# Altium PCB DFMM_2025_V2.4.PcbDoc (part 2 of 2)
Units mil, origin at the board's own origin, x right, y up, seen from the top; angles counter-clockwise.
Board outline 3287.4 x 3929 mil, 4 copper layers (Top Layer, GND Plane Top, GND Plane Bott, PWR Plane), stack 33.512 mil thick; 148 components, 96 nets, 516 pads, 245 vias.
Unrouted connection lines stored in the file: 38.
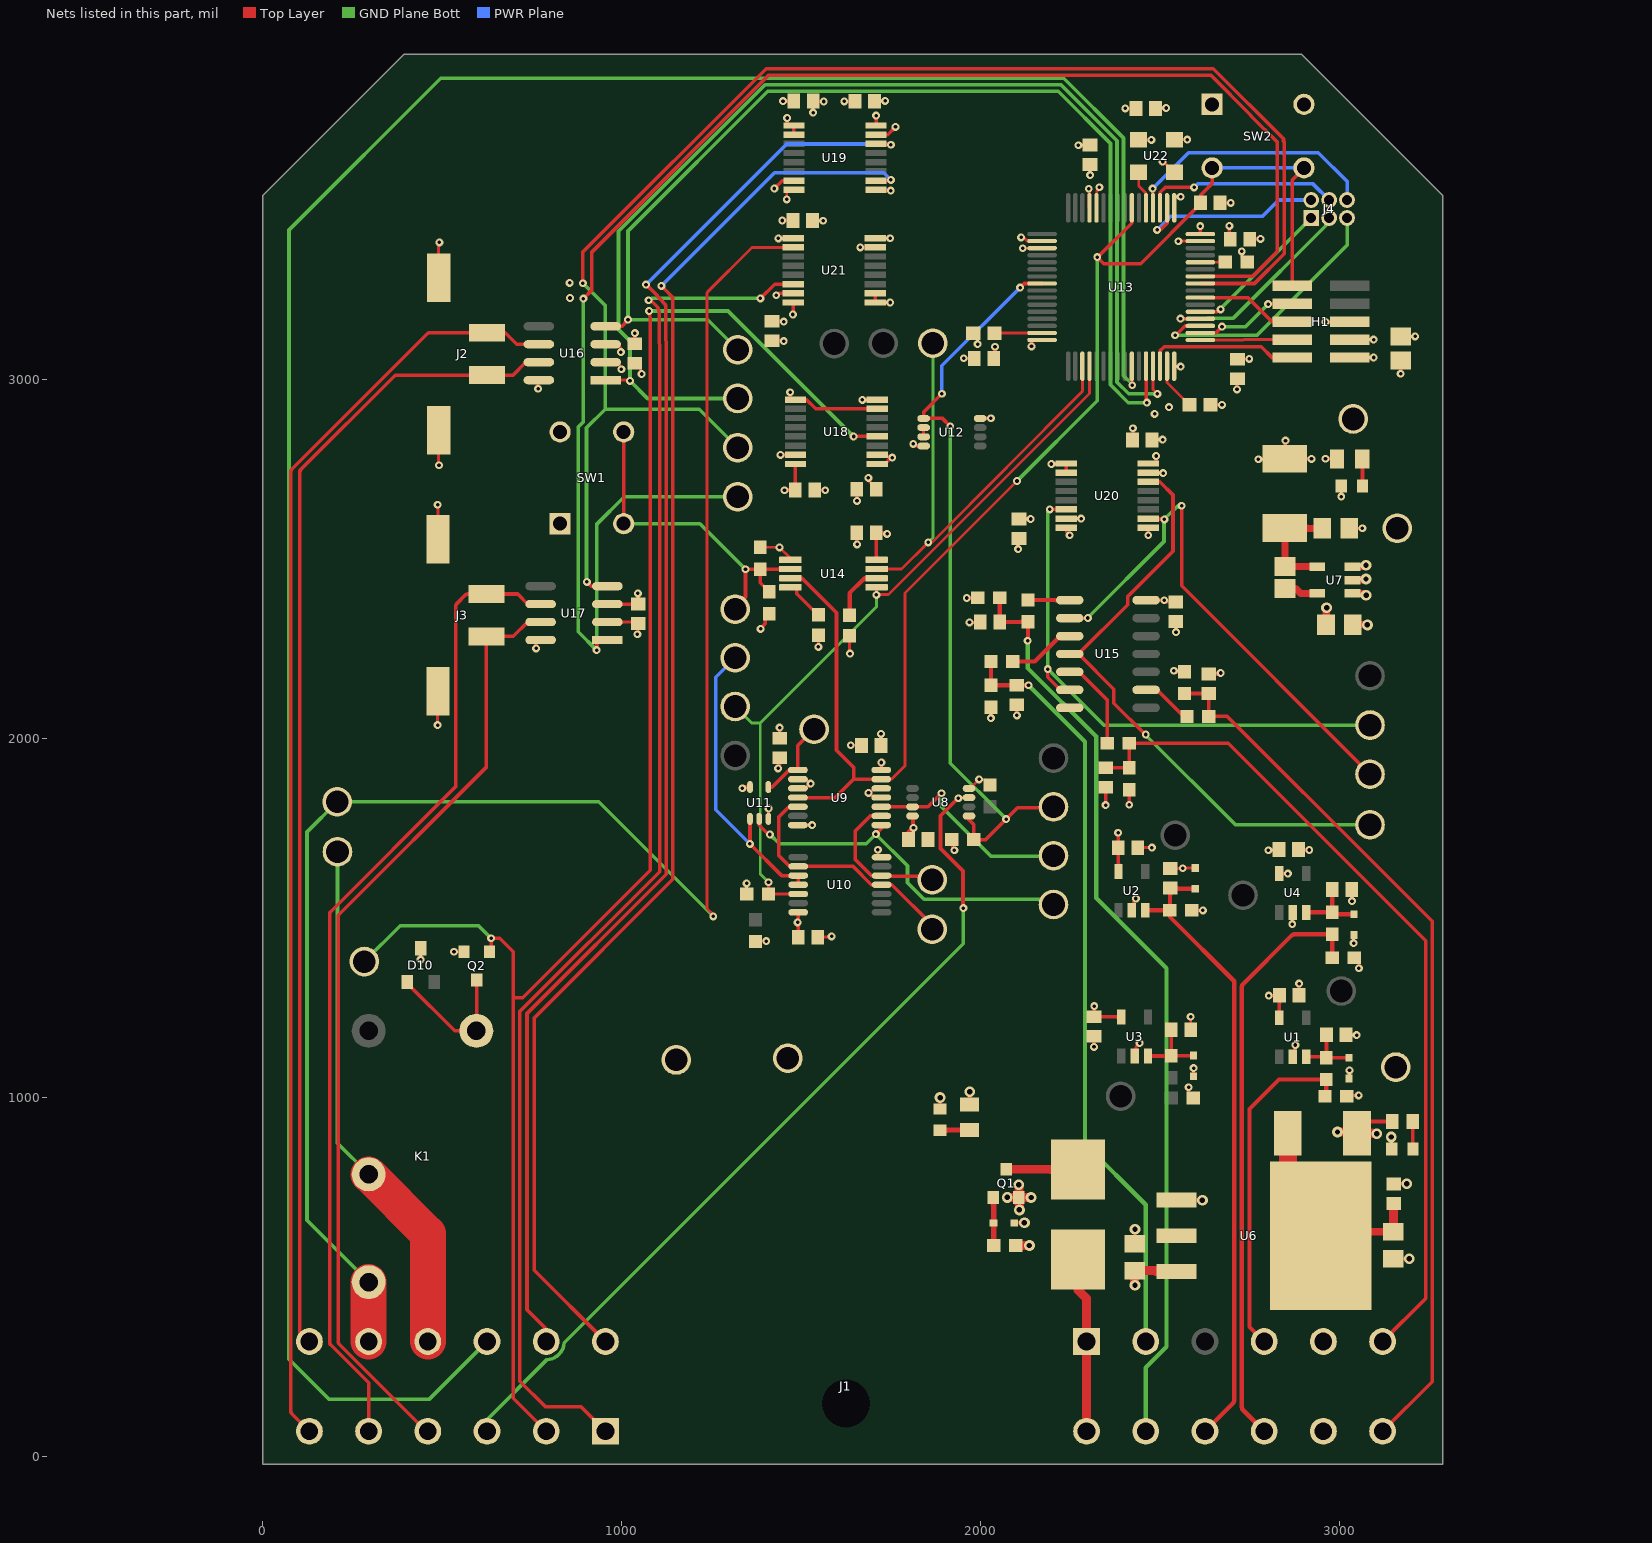
[diagram p4: the nets of this part, all layers, seen from the top]

## Via types
v1: diameter 22, hole 10, Top Layer to PWR Plane, tented both sides, 224 vias
v2: diameter 30, hole 15, Top Layer to PWR Plane, tented both sides, 21 vias

## Nets (pads, with @x,y where several pads share a name; then routed paths per layer and width w, separated by ;. In a path a pad name is that pad's centre, name@x,y a point inside that pad or via, vN(x,y) a via of type N, cw(c..) or ccw(c..) an arc to the next point about the centre after c; other vN are vias at no path point) (continued)
12V_ROT_2_SIG: ROTR2.1 U15.6 U20.6 | length 1557.8
  Top Layer w10: v1(2187,2193) 2187,2169.83 2221.83,2135 U15.6@2248.4,2135 ; v1(2192.51,2638) 2192.7,2637.82 U20.6@2238.65,2637.82
  GND Plane Bott w10: ROTR2.1@3085,2037 2343,2037 v1(2187,2193) 2187,2629.78 v1@2192.51,2635.29 ; v1@2192.51,2635.29 v1(2192.51,2638) v1@2192.51,2635.29
12V_ROT_3_SIG: ROTR3.1 U15.2 U20.10 | length 1490.5
  Top Layer w10: U15.2@2248.4,2335 2298.62,2335 v1(2298.79,2335.17) ; U20.10@2467,2612.23 U20.10@2491.53,2611 ; U20.10@2491.53,2608.54 U20.10@2491.53,2611 ; v1(2512,2610) 2510.89,2611.11 2491.53,2611.11 U20.10@2491.53,2611 ; v1(2560,2648) 2560,2425 ROTR3.1@3085,1900
  GND Plane Bott w10: v1(2298.79,2335.17) 2298.79,2336 2511,2548.21 v1@2511,2610 ; v1(2512,2610) 2548,2646 2558,2646 v1(2560,2648)
12V_ROT_4_SIG: ROTR4.1 U15.4 U20.14 | length 1695
  Top Layer w10: U15.4@2248.4,2235 2272,2235 2409.61,2372.61 2409.61,2395.28 2536,2521.66 2536,2678 2499.41,2714.59 U20.14@2467,2714.59 U20.14@2468.3,2713.3 ; U15.4@2273,2235 2371.06,2136.94 2371.06,2097.94 2458.31,2010.69 v1(2460.15,2010.69)
  GND Plane Bott w10: v1(2460.15,2010.69) 2460.15,2008.85 2710,1759 ROTR4.1@3085,1759
+3V3: +3v3.1 C17.1 C18.1 C19.1 C20.1 C21.1 C22.2 C23.2 C24.2 C25.2 C28.1 C34.1 C38.1 C39.1 C43.1 C44.1 C46.1 C47.2 F4.2 H1.1 R12.2 R23.2 U8.8 U9.14 U10.14 U11.5 U12.8 U13.1 U13.13 U13.19 U13.32 U13.48 U13.64 U14.8 U16.3 U17.3 U18.1 U18.2 U18.7 U18.9 U18.15 U19.16 U20.16 U21.16 U22.1 U22.4 | length 2132.5
  Top Layer w8: U17.3@995.95,2374 U17.3@996.79,2373.17 ; v1(2117.41,3365.43) 2117.59,3365.61 2171.07,3365.61 U13.19@2171.26,3365.8 ; C47.2@2504.17,3756 2516.61,3756 v1(2516.88,3756.27) ; v1(2507.22,3607.13) 2508.63,3607.13 2538.03,3577.72 U22.4@2540,3577.72 ; U13.48@2539.37,3037.06 2540.86,3035.56 v1(2557.28,3035.56) ; U22.1@2540,3668.28 2575.34,3668.28 v1(2575.62,3667.99) ; C25.2@2716,3056.33 2747.68,3056.33 v1(2748.47,3057.13)
  Top Layer w10: U16.3@955.06,3098 986.3,3098 996.08,3088.22 996.08,3077.9 v1(997.77,3076.22) ; U17.3@960.06,2374 995.95,2374 1024.36,2374 1024.53,2374.17 C38.1@1046,2374.17 1046,2402.88 v1(1045,2403.88) ; C34.1@1036,3099.17 1036,3128.13 v1(1036.75,3128.88) ; v1(1336,1861) 1338.71,1861 1342,1864.29 U11.5@1357.41,1864.29 ; v1(1387,2305) 1387,2307 1400.43,2320.43 1400.43,2333.79 1401.2,2334.56 R23.2@1414.56,2334.56 ; C44.1@1419,3162.17 1450.24,3162.17 v1(1451.47,3160.93) ; C18.1@1434.41,1943 1439.66,1937.75 1439.66,1926.59 1438.13,1925.07 1438.13,1918.41 v1(1435.83,1916.12) ; v1(1442.3,2789.77) 1453.04,2789.77 1453.3,2790.02 U18.15@1483.83,2790.02 ; v1(1469.07,2964.43) 1469.07,2947.37 1472.87,2943.57 1515.01,2943.57 1540.6,2917.98 U18.7@1712.17,2917.98 ; v1(1477,3181) 1477.83,3181.83 U21.16@1477.83,3214.43 U21.16@1478,3210.57 ; C19.1@1491.83,1446 1491.83,1485.17 v1(1490,1487) 1491.86,1488.86 U10.14@1491.86,1515.23 ; v1(1687.14,2725.61) 1689.43,2723.31 1689.43,2716.65 1709.33,2696.76 C46.1@1709.33,2694 ; C43.1@1704.17,3775 1732.94,3775 v1(1733.88,3775.95) ; U19.16@1708.17,3707.57 1709,3708.39 v1(1709,3735) ; U18.1@1709.33,2761.59 U18.1@1712.17,2764.43 ; U14.8@1710.08,2497.39 1710.08,2507.24 1709.17,2508.16 C28.1@1709.17,2573 1710.17,2572 1737.09,2572 v1(1739.37,2569.72) ; U18.2@1712.17,2790.02 1713.91,2788.29 1738.82,2788.29 v1@1745.1,2782.02 ; U18.1@1716.03,2768.29 1736.7,2768.29 1745.1,2776.69 v1@1745.1,2782.02 ; C20.1@1722.33,1980 1722.33,2012.38 v1(1722.42,2012.47) ; U9.14@1723.14,1911.77 1723.14,1932.45 v1(1723.32,1932.63) ; v1(1753.7,2782.02) v1@1745.1,2782.02 ; C17.1@1798.83,1718 1798.83,1739.07 1810.24,1750.47 v1(1812.99,1750.47) ; U8.8@1810.26,1783.61 1811.63,1782.25 1811.63,1749.04 v1@1812.99,1747.67 ; U12.8@1998.74,2891.39 1999.03,2891.67 2028.16,2891.67 v1(2028.45,2891.96) ; C23.2@2036.98,3058.5 2040,3061.52 v1(2040,3090.97) ; v1(2141.71,3091.98) 2141.71,3109.05 2142.54,3109.89 U13.32@2171.26,3109.89 ; v1(2301.29,3531.24) 2302.8,3529.73 2302.8,3478.35 U13.13@2303.15,3478 ; C22.2@2305,3599.17 2305.11,3599.06 v1(2305.11,3569.45) ; U20.16@2467,2765.77 2485.17,2765.77 2489.03,2769.63 v1(2489.03,2786.63) ; C39.1@2477.33,2831.41 2478.09,2832.17 v1(2507.05,2832.17) ; U13.1@2539.37,3442.57 U13.1@2539.37,3492.84 ; U13.1@2539.37,3489.84 2539.37,3507.88 2540.21,3508.72 2556.99,3508.72 v1(2557.28,3509) ; v1(2612,3427) 2612,3405.37 U13.64@2612.2,3405.17 ; v1(2693,3428) 2693,3393.83 C24.2@2695.83,3391 ; v1(2773.99,2777.63) 2846.72,2777.63 F4.2@2848,2778.91 ; v1(2849.43,2829.5) 2848,2828.07 F4.2@2848,2778.91 ; v1(2922.01,2778.7) 2921.8,2778.91 F4.2@2848,2778.91 ; v1(2960.88,2779.06) 2991.51,2779.06 R12.2@2992.57,2778 ; H1.1@3028,3061 v1(3095,3061.01) ; C21.1@3170,3052.54 3170.26,3052.27 v1(3170.26,3015.93)
+5V: +5V.1 C15.1 F2.2 R13.1 U7.1 U7.3 | length 343.1
  Top Layer w10: F2.2@3048.91,900 3081.39,932.47 R13.1@3147,932.47
  Top Layer w20: U7.1@3036.21,2403.6 3066.7,2403.6 3071.29,2399 v2(3074,2399) ; U7.3@3036.21,2478.4 3067.4,2478.4 3069.09,2480.09 3071.95,2480.09 v2(3073.87,2482) ; C15.1@3037,2317 3076.61,2317 v2(3077.61,2316)
  Top Layer w25: v2(2994.33,903) 3045.91,903 F2.2@3048.91,900 3090.74,900 3091.78,898.96 3103.04,898.96 v2(3104,898)
+12V: +12V.1 C5.2 C6.2 C7.2 C8.2 C12.1 C37.2 C40.1 C41.2 C42.2 C45.2 D9.1 D10.3 Q1.2 R11.2 R26.1 R27.1 R30.1 R31.1 U1.5 U2.5 U3.5 U4.5 U6.3 U15.14 U18.16 U19.1 U19.2 U19.7 U19.9 U19.15 U20.1 U20.2 U20.7 U20.9 U20.15 U21.1 U21.2 U21.7 U21.9 U21.15 | length 1772.6
  Top Layer w10: v1(439.9,1383.56) 439.9,1415.15 D10.3@440,1415.24 ; v1(1425.27,3532.01) 1447.28,3554.02 U19.7@1479.83,3554.02 ; v1(1430.56,3234.6) 1433.27,3234.6 1438.7,3240.02 U21.15@1477.83,3240.02 ; v1(1436.3,3393) 1436.58,3393.28 1477.54,3393.28 U21.9@1477.83,3393.57 ; v1(1447.28,3442.88) 1447.4,3443 C42.2@1477,3443 ; v1(1449.28,3775.54) 1478.54,3775.54 C41.2@1479,3776 ; v1(1453.45,2691.26) 1454.19,2692 C45.2@1483.17,2692 1483.83,2692.66 U18.16@1483.83,2764.43 ; v1(1461.01,3728.43) 1461.01,3711.43 1464.87,3707.57 U19.1@1479.83,3707.57 U19.2@1479.83,3681.98 ; v1(1664.65,3367.89) 1664.69,3367.93 1706.13,3367.93 U21.7@1706.17,3367.98 ; U21.2@1706.17,3240.02 U21.1@1706.17,3214.43 1706.26,3214.34 1747.61,3214.34 v1(1747.7,3214.25) ; U19.9@1708.17,3528.43 1709.4,3527.2 1748.47,3527.2 v1(1749.7,3525.98) ; U19.15@1708.17,3681.98 1741.19,3681.98 v1(1762.73,3703.52) ; v1(1961.28,2390.89) 1990.87,2390.89 R27.1@1991.98,2392 ; R11.2@1969,979.43 1970,980.43 v2(1970,1015.12) ; v1(2028.45,2056.28) 2028.45,2086.43 R26.1@2029,2086.98 ; D9.1@2093.94,650 v2(2122,650) ; C40.1@2107.03,2611.13 2107.17,2611 2129.66,2611 2129.75,2611.1 v1(2139.47,2611.1) ; v1(2197.13,2764.41) 2197.81,2765.09 2237.97,2765.09 U20.1@2238.65,2765.77 U20.2@2238.65,2740.18 ; U20.7@2238.65,2612.23 2238.75,2612.13 2280.08,2612.13 v1(2280.18,2612.03) ; v1(2316.53,1253.88) 2316.53,1224.7 C7.2@2316,1224.17 2377.88,1224.17 2378.79,1223.26 U3.5@2391.6,1223.26 ; v1(2383,1737) 2383.83,1736.17 C6.2@2383.83,1695 2383.83,1651.3 2384.2,1650.94 U2.5@2384.2,1629.27 ; v1(2414,1815) R30.1@2414,1856.98 ; U15.14@2461,2385 2461.06,2384.94 v1(2511.53,2384.87) v1(2511.53,2384.87) ; v1(2467,2565.78) U20.9@2467,2586.64 ; U20.15@2467,2740.18 2467.58,2739.6 2507.97,2739.6 v1(2508.55,2739.02) ; v1@2512.03,2384.61 2515.04,2384.61 2519.48,2380.17 C37.2@2544,2380.17 ; v1(2538.28,2188.3) 2540.56,2186.02 R31.1@2568,2186.02 ; v1(2801.95,1688.04) 2803.91,1690 C8.2@2831.67,1690 ; v1(2802.95,1283.21) 2831.88,1283.21 C5.2@2832.67,1284 2832.67,1262.53 2832.6,1262.46 U1.5@2832.6,1221.26 ; U4.5@2832.2,1623.27 2845.1,1623.27 v1(2856.01,1623.27)
  Top Layer w25: v2(2074.32,720.98) 2075.67,720.98 2076.64,721.96 2078.18,721.96 2079.51,720.63 Q1.2@2106.43,720.63 ; v2(2106,756) 2106.43,755.57 Q1.2@2106.43,720.63 ; v2(2108,686) 2106.98,715.41 Q1.2@2106.43,720.63 ; v2(2140.63,720.63) Q1.2@2106.43,720.63 ; v2(2430,475.99) 2429.04,476.95 2429.04,486.96 2429,487 C12.1@2429,516.6 2486.2,516.6 2488.8,514 U6.3@2545.91,514
+12V_IN: F3.1 J1.B1 J1.B12 | length 488
  Top Layer w25: F3.1@2271,547.41 2271,462.94 2295.2,438.75 J1.B1@2295.2,319.39 J1.B12@2295.2,69.39
\u\R\S\T\: C29.2 H1.10 SW2.3 SW2.4 U9.4 U9.13 U13.7 U14.3 | length 3880.2
  Top Layer w8: U9.13@1723.14,1886.18 1751.7,1886.18 1789.1,1923.58 1789.1,2404.82 v1(2101.28,2717)
  Top Layer w10: U14.3@1469.92,2446.2 1502.42,2446.2 1598.5,2350.12 1598.5,1966.5 1646,1919 1646,1886.18 ; U9.4@1490.86,1835 1594.82,1835 1646,1886.18 ; U9.13@1723.14,1886.18 1646,1886.18 ; U13.7@2421.26,3478 2421.26,3435.52 2326.74,3341 v1(2325,3341) 2343.33,3322.67 2446.26,3322.67 2612.83,3489.24 2612.83,3513.47 2645.05,3545.68 SW2.3@2645.05,3589.42 ; U13.7@2421.26,3514.27 U13.7@2422.04,3513.49 ; H1.10@2868,3261 2868,3555.46 SW2.4@2900.95,3588.42
  GND Plane Bott w10: v1(2101.28,2717) 2325,2940.72 v1(2325,3341)
  PWR Plane w10: SW2.3@2645.05,3589.42 SW2.4@2900.95,3589.42
\W\D\O\: R18.1 U10.12 U13.36 U14.5 WDO.1 | length 2069.6
  Top Layer w8: R18.1@1409,1566 v1(1409,1599) ; R18.1@1409,1566.41 U10.12@1491.86,1566.41 ; v1(1709.62,2399.76) 1709.62,2420.15 U14.5@1710.08,2420.61 ; v1@1712.53,2400.76 1743.36,2400.76 2303.15,2960.54 U13.36@2303.15,3037.06
  GND Plane Bott w8: WDO.1@1316,2088.67 1362.07,2042.59 1386,2042.59 ; v1(1409,1599) 1386,1622 1386,2042.59 ; v1(1709.62,2399.76) 1710,2399.37 1710,2366.59 1386,2042.59
ANL_1: J1.A11 U19.14 | length 4038
  Top Layer w10: J1.A11@789.69,319.39 786.14,322.93 786.14,357.79 736,407.93 736,1233.46 1123.78,1621.24 1123.78,3012.21 ; v1(1067.76,3264.24) 1092.73,3240.37 1120.44,3209.54 cw(c1113,3202.86) 1123,3202.86 1123.78,3012.26 ; U19.14@1708.17,3656.39 1709.36,3655.2 1748.95,3655.2 v1(1750.13,3654.02)
  PWR Plane w10: v1(1067.76,3264.24) 1459.53,3656 1748.15,3656 v1(1750.13,3654.02)
ANL_2: J1.A12 U19.10 | length 4016.9
  Top Layer w10: J1.A12@954.65,319.39 756,518.03 756,1221 1142,1607 1142,3224.44 1142,3224.49 ccw(c1132,3224.38) 1139.1,3231.43 1134.14,3236.41 1130.89,3239.69 v1(1110.41,3260.56) ; U19.10@1708.17,3554.02 1747.94,3554.01 v1(1749.9,3555.98)
  PWR Plane w10: v1(1110.41,3260.56) 1425.84,3576 1729.88,3576 v1(1749.9,3555.98)
AS_CLOSE_SDC: "SDC CLS.1" R15.1 U8.1 U12.1 U13.24 | length 2113.2
  Top Layer w10: v1(1892,2960) 1841.26,2909.26 U12.1@1841.26,2891.39 1893.7,2891.39 v1(1915.47,2869.61) ; U8.1@1967.74,1783.61 1967.74,1772.97 1981,1759.71 R15.1@1981,1718 ; R15.1@1981.98,1718 2014,1718 v1(2071,1775) 2103,1807 2203,1807 ; v1(2110,3256) 2121.37,3267.37 U13.24@2171.26,3267.37
  GND Plane Bott w10: v1(1915.47,2869.61) 1915.47,1930.53 v1(2071,1775)
  PWR Plane w10: v1(1892,2960) 1892,3038 v1(2110,3256)
AS_SDC_FAULT: "AS SDC FLT.1" J1.A2 Q2.1 U18.4 | length 4768.2
  Top Layer w10: 260,1376 260.5,1375.5 ; Q2.1@631.43,1405.37 636,1418.09 v1(636,1443) 660.51,1443 698,1405.51 698,1277 ; 698,1250.37 698,1251 ; J1.A2@789.69,69.39 698,161.07 698,1251 ; v1(1076.43,3190.75) 1079.47,3168.04 1079.47,1632.47 724,1277 698,1277 ; v1(1646,2841) 1646.2,2841.2 U18.4@1712.17,2841.2 ; 698,1251 698,1277
  GND Plane Bott w10: 283,1378 383,1478 601,1478 v1(636,1443) ; v1(1076.43,3190.75) 1296.25,3190.75 v1(1646,2841)
ASSI_TX: J1.A10 U13.42 | length 7132.2
  Top Layer w10: U13.42@2421.26,3037.06 2421.61,3036.71 2421.61,2984.55 v1(2422.41,2983.75)
  GND Plane Bott w10: J1.A10@624.72,319.39 464.34,159 184,159 73,270 73,3416.54 495.46,3839 2231.46,3839 2398,3672.46 2398,3010.71 2422.41,2986.3 v1(2422.41,2983.75)
BMS_FAULT: J1.B4 R1.1 R2.2 | length 960.5
  Top Layer w12: J1.B4@2790.08,319.39 2749.3,360.17 2749.3,967.3 2831.5,1049.5 2944.22,1049.5 2944.29,1049.43 R1.1@2963.01,1049.43 2963.01,1006.52 R2.2@2959.49,1003
BSPD_FAULT: J1.B9 R6.1 R7.2 | length 1642.8
  Top Layer w12: J1.B9@2790.08,69.39 2731.51,127.95 cw(c2740,136.44) 2728,136.39 2728,1307.03 cw(c2740,1307.03) 2731.51,1315.51 2866.49,1450.49 cw(c2874.95,1441.98) 2874.95,1453.98 R6.1@2980,1453.98 2980,1408.23 2979.49,1407.72 R7.2@2979.49,1389
CAN1_N: J1.A7 J2.1 U16.7 | length 3225.1
  Top Layer w10: J1.A7@129.84,319.39 105.91,343.32 cw(c113,350.37) 103,350.37 103,2741.86 cw(c113,2741.86) 105.93,2748.93 366.02,3009.02 cw(c373.09,3001.95) 373.09,3011.95 J2.1@624.65,3011.95 697,3011.95 733.05,3048 758.65,3048 U16.7@753.06,3042.4
CAN1_P: J1.A6 J2.2 U16.6 | length 3550.4
  Top Layer w10: J1.A6@129.84,69.39 80.93,118.3 cw(c88,125.37) 78,125.37 78,2742.86 cw(c88,2742.86) 80.91,2749.91 458.13,3127.13 cw(c465.21,3120.06) 465.21,3130.06 J2.2@624.65,3130.06 675.65,3130.06 707.71,3098 U16.6@758.65,3098
CAN1_RX: "C1 RX.1" U13.44 U16.4 | length 3111.6
  Top Layer w10: U16.4@965.35,3148 992.76,3148 1001.05,3148 1006.9,3153.86 1016.54,3166.65 v1(1017.54,3166.65) ; U13.44@2460.63,3037.06 2460.98,3036.71 2460.98,2937.44 v1(2463.23,2935.19)
  GND Plane Bott w10: 1323,3083 1239.35,3166.65 v1(1017.54,3166.65) 1017.54,3413.68 1406.86,3803 2216.54,3803 2362,3657.54 2362,2984.76 2411.57,2935.19 v1(2463.23,2935.19)
CAN1_TX: "C1 TX.1" U13.45 U16.1 | length 3312.8
  Top Layer w8: U16.1@965.35,2998 1021,2998 v1(1023,2996) ; U13.45@2480.31,3037.06 2480.31,2972.01 v1(2492.58,2959.75)
  GND Plane Bott w10: 1323,2947 1072,2947 v1(1023,2996) 1023,3018.27 1023.19,3018.46 1023.19,3107.16 991,3139.36 991,3412.6 1399.4,3821 2224,3821 2380,3665 2380,2992.22 2412.47,2959.75 v1(2492.58,2959.75)
CAN2_N: J1.A4 J3.1 U17.7 | length 2647.9
  Top Layer w10: J1.A4@459.76,69.39 455.71,69.39 212.93,312.16 cw(c220,319.24) 210,319.24 210,1502.86 cw(c220,1502.86) 212.93,1509.93 623,1920 J3.1@623,2284 698.05,2284 738.05,2324 U17.7@763.65,2324
CAN2_P: J1.A5 J3.2 U17.6 | length 2741.7
  Top Layer w10: J1.A5@294.8,69.39 294.8,204.83 188.93,310.71 cw(c196,317.78) 186,317.78 186,1509.86 cw(c196,1509.86) 188.93,1516.93 535.07,1863.07 ccw(c528,1870.14) 538,1870.14 538,2368.86 cw(c548,2368.86) 540.9,2375.9 564.17,2399.17 cw(c571.25,2392.11) 571.25,2402.11 J3.2@623,2402.11 709.94,2402.11 738.05,2374 U17.6@763.65,2374
CAN2_RX: "C2 RX.1" U13.57 U17.4 | length 4286.9
  Top Layer w10: v1(892,3268) 892,3355.46 1402.54,3866 2648.45,3866 2844,3670.45 2844,3664 2846,3662 2846,3350.23 2763.14,3267.37 U13.57@2612.2,3267.37 U13.57@2612.55,3267.02 ; v1(903.09,2435.79) 914.88,2424 U17.4@970.35,2424
  GND Plane Bott w10: v1(892,3268) 954,3206 954,2917 ; v1(903.09,2435.79) 902,2436.88 902,2865 954,2917 ; 1323,2810 1216,2917 954,2917
CAN2_TX: "C2 TX.1" U13.58 U17.1 | length 4714.4
  Top Layer w10: v1(893,3225) 893,3225.24 917,3249.24 917,3355 1410,3848 2640.99,3848 2752.96,3736.03 2752.96,3735.04 2826,3662 2826,3355.69 2757.37,3287.06 U13.58@2612.2,3287.06 ; v1(930,2246) 930,2267.54 936.46,2274 U17.1@960.06,2274
  GND Plane Bott w10: v1(893,3225) 893,2881.46 879,2867.46 879,2297 v1(930,2246) 930,2596 1007,2673 1323,2673
EBS_LED: J1.A3 U8.3 | length 2397.9
  Top Layer w8: v1(1938.09,1833.08) 1939.8,1834.8 U8.3@1967.74,1834.8
  Top Layer w10: v1(1938.09,1833.08) 1936.98,1833.08 1888.28,1784.38 1888.28,1693.05 1951,1630.33 1951,1527.86 v1(1951.77,1527.09)
  GND Plane Bott w10: J1.A3@624.72,69.39 624.72,101.72 792.04,269.04 ccw(c789.69,319.39) 825.32,283.75 ccw(c791.6,317.47) 825.55,283.97 ccw(c789.69,319.39) 839.97,315.97 1951.77,1427.77 v1(1951.77,1527.09)
GND: C1.1 C2.1 C3.1 C4.1 C5.1 C6.1 C7.1 C8.1 C12.2 C13.2 C14.1 C15.2 C16.2 C17.2 C18.2 C19.2 C20.2 C21.2 C22.1 C23.1 C24.1 C25.1 C26.2 C27.2 C28.2 C29.1 C30.2 C31.2 C32.1 C33.1 C34.2 C35.1 C36.1 C37.1 C38.2 C39.2 C40.2 C41.1 C42.1 C43.2 C44.2 C45.1 C46.2 C47.1 D1.2 D2.2 D3.2 D4.2 D6.2 D7.2 D8.2 GND2.1 GND.1 H1.3 H1.5 J1.B5 J1.B8 J2.3 J2.4 J3.3 J3.4 Q2.2 R2.1 R3.1 R5.1 R7.1 R14.1 R15.2 R16.2 R17.2 R18.2 R24.1 R25.1 SW1.1 SW1.2 SW2.1 SW2.2 U1.2 U2.2 U3.2 U4.2 U6.1 U7.2 U8.4 U9.2 U9.3 U9.7 U9.11 U9.12 U10.7 U11.3 U12.4 U13.12 U13.18 U13.63 U14.1 U15.7 U16.2 U16.8 U17.2 U17.8 U18.8 U19.8 U20.8 U21.8 U22.2 | length 3879.3
  Top Layer w8: v1(487,2037) 487,2129.69 J3.4@488.35,2131.05 ; v1(487.2,2650.87) 488.35,2649.72 J3.3@488.35,2555.06 ; J2.4@490,2859 490,2762 v1(491,2761) ; J2.3@490,3283.02 490,3380 v1(492,3382) ; v1(532.82,1405.27) 560.47,1405.27 Q2.2@560.57,1405.37 ; U16.8@758.65,2998 760.11,2998 767,2991.11 v1(767,2974) ; v1(761.46,2250.54) 761.46,2271.8 U17.8@763.65,2274 ; U16.2@955.06,3048 986.3,3048 995.11,3039.19 995.11,3036.28 999.19,3032.19 v1(999.19,3028.4) ; U17.2@960.06,2324 1041.83,2324 1050,2315.83 1046,2311.83 1046,2292.65 v1(1043.46,2290.12) ; C34.2@1036,3044.83 1038.76,3044.83 1052.47,3031.12 1052.47,3021.91 1055.47,3018.91 v1(1055.47,3015.12) ; R18.2@1347.98,1566 1347.98,1595.56 v1(1348.14,1595.72) ; R17.2@1373,1433.98 1374.2,1435.18 v1(1402.72,1435.18) ; R24.1@1386,2532.51 1439.1,2532.51 v1(1439.62,2531.99) 1469.37,2502.24 U14.1@1469.92,2497.39 ; U11.3@1408.59,1775.71 1409,1776.12 1409,1804.06 v1(1409.37,1804.43) ; v1(1459.72,3501.73) 1459.72,3523.57 1464.58,3528.43 U19.8@1479.83,3528.43 U19.8@1502.62,3523.57 ; U9.7@1490.86,1758.23 1490.91,1758.28 v1(1530.42,1758.34) v1(1530.42,1758.34) ; U9.3@1490.86,1860.59 1512.19,1860.59 1516.92,1865.32 1518.2,1865.32 1526.45,1873.58 v1(1526.45,1873.95) ; U9.2@1490.86,1886.18 1512.19,1886.18 1516.92,1881.45 1518.2,1881.45 v1@1523.61,1876.04 ; C42.1@1531.33,3443 1532.3,3442.03 v1(1561.05,3442.03) ; v1(1533.42,3743.53) 1533.42,3775.91 C41.1@1533.33,3776 1534.98,3774.35 v1(1563.05,3774.35) ; C45.1@1537.5,2692 1566.47,2692 v1(1567.21,2691.26) ; C19.2@1546.17,1446 1583,1446 v1(1585,1448) ; v1(1548,2255) C26.2@1548,2286.78 ; v1(1620.12,3774.54) 1649.38,3774.54 C43.2@1649.83,3775 ; C27.2@1635,2285.39 1635,2237 v1(1636,2236) ; v1(1638.28,1980.63) 1667.37,1980.63 C20.2@1668,1980 ; C46.2@1655,2694 1655.64,2693.36 v1(1655.64,2661.53) ; v1(1670.65,2942.92) 1670.97,2943.24 1711.85,2943.24 U18.8@1712.17,2943.57 ; v1(1687.65,1848.22) 1687.65,1847.89 1695.8,1839.73 1697.08,1839.73 1701.81,1835 U9.11@1723.14,1835 ; v1@1691.17,1848.12 1691.17,1849.54 1702.23,1860.59 U9.12@1723.14,1860.59 ; U21.8@1706.17,3393.57 1706.28,3393.46 1747.59,3393.46 v1(1747.7,3393.35) ; v1(1713.8,1689.63) 1713.8,1673.26 1718.29,1668.77 U10.7@1724.14,1668.77 ; v1(1812.32,2820.37) 1816.1,2820.37 1821.86,2814.61 U12.4@1841.26,2814.61 ; D6.2@1887,967.15 1887.19,967.34 v2(1887.19,998.9) ; R15.2@1919.98,1718 1920.96,1717.02 1920.96,1698.09 1926.98,1692.07 v1(1926.98,1688.28) ; v1(1952.93,3059.01) 1963.62,3059.01 1964.13,3058.5 C23.1@1982.65,3058.5 ; U8.4@1967.74,1860.39 1972.45,1860.39 1980.59,1868.52 1980.59,1870.3 1995.88,1885.59 v1(1996.01,1885.59) 1996.88,1884.72 2012.28,1884.72 2026,1871.01 R16.2@2026,1870.02 ; v1(1968.95,2323) 1997.67,2323 C33.1@1998.67,2324 ; C31.2@1979.47,3129 1991.86,3116.61 v1(1991.86,3098.3) ; v1(2104.46,2527.12) 2104.46,2554.3 C40.2@2107,2556.83 ; v1(2112.67,3396) 2115.35,3393.32 2122.35,3393.32 2129.46,3386.21 2170.53,3386.21 U13.18@2171.26,3385.48 ; U20.8@2238.65,2586.64 2238.65,2575.13 v1(2248,2565.78) ; v1(2316,1140.12) C7.1@2316,1169.83 ; U13.12@2322.83,3478 2323.56,3478.73 2323.56,3524.3 2330.99,3531.72 v1(2330.99,3535.51) ; v1(2403.12,3755.44) 2432.39,3755.44 C47.1@2432.83,3755 ; U2.2@2421.6,1521 2425.22,1524.62 2425.22,1544.24 2432.59,1551.61 v1(2432.59,1553.83) ; C39.2@2423,2831.41 2424.29,2832.7 v1(2424.29,2863.88) ; C12.2@2429,591.4 2430,592.4 v2(2430,632.01) ; U3.2@2429,1114.99 2432.56,1118.55 2432.56,1140.45 v1(2443.04,1150.94) ; C6.1@2438.17,1695 2438.87,1695.71 v1(2477.29,1695.71) ; U22.2@2440,3668.28 2440.92,3667.35 v1(2475.62,3667.35) ; C2.1@2528,1637.33 2562.58,1637.33 v1(2563.25,1638) 2564.13,1638.87 D2.2@2598,1638.87 ; C37.1@2544,2325.83 2544.49,2325.34 v1(2544.49,2296.12) ; U6.1@2545.91,714 2546.7,713.21 2617.8,713.21 v2(2618.01,713) ; v1(2551,3385) 2551.24,3385.24 2611.96,3385.24 U13.63@2612.2,3385.48 ; v1(2579.67,1027.84) 2579.67,1010.46 R5.1@2592,998.13 ; C3.1@2585.35,1188.36 v1(2585.35,1224.35) ; R3.1@2588.51,1521 2588.87,1520.65 v1(2619.21,1520.65) ; D3.2@2593,1058.19 2593.27,1058.46 2593.27,1080.75 v1(2593.54,1081.02) ; C30.2@2641,2930 2671.59,2930 v1(2672.69,2928.9) ; C29.1@2667.17,3492 2667.25,3491.92 v1(2696.88,3491.92) ; v1(2714.45,2972.28) 2714.45,3000.45 C25.1@2716,3002 ; v1(2868.23,1482.33) 2869.6,1483.69 U4.2@2869.6,1515 ; U1.2@2870,1112.99 2874.32,1117.31 2874.32,1142.98 v1(2877,1145.66) ; C8.1@2886,1690 C8.1@2887,1691 ; C5.1@2887,1284 2887.51,1284.51 v1(2887.51,1316.47) ; v1(2961,3159.94) 3026.94,3159.94 H1.5@3028,3161 ; v1(3004.75,2673.28) 3004.75,2702.9 D8.2@3004.85,2703 ; C1.1@3018.13,1174.43 3019.49,1173.06 v1(3047.84,1173.06) ; R2.1@3020.51,1003 3022.83,1005.31 v1(3053.21,1005.31) ; D1.2@3026,1052.19 3026.93,1053.12 3026.93,1074.09 v1(3027.85,1075.02) ; C16.2@3027,2585 3063.22,2585 v1(3063.61,2585.39) ; H1.3@3028,3111 3028.1,3111.1 v1(3095,3111.1) ; C4.1@3034,1579 3034,1558.52 3034.79,1557.72 v1(3034.79,1546.53) ; v1(3039.42,1429.24) 3039.71,1429.53 3039.71,1451.77 D4.2@3040,1452.06 ; R7.1@3040.51,1389 3054.07,1375.44 v1(3054.07,1359.28) ; v2(3144,889.19) 3144,856.9 D7.2@3145.43,855.47 ; C13.2@3150,550.39 3150.39,550 v2(3194.54,550) ; C14.1@3151,758.53 3151.61,759.14 v2(3187.47,759.14) ; C21.2@3170,3119.46 3170.4,3119.87 v1(3210.54,3119.87)
  Top Layer w10: C44.2@1419,3107.83 1450.49,3107.83 v1(1451.47,3106.85) ; C18.2@1440,2000.17 1440.15,2000.31 v1(1440.15,2029.88) ; C28.2@1654.83,2573 1654.83,2541.57 v1(1655.88,2540.53) ; v1(2100.87,2063.95) 2100.87,2093.54 C32.1@2101,2093.67 ; v1(2272.53,3652.42) 2303.92,3652.42 C22.1@2305,3653.5 ; v1(2348.32,1813.76) 2348.32,1862.99 C35.1@2349,1863.67 ; C36.1@2636,2179.33 2660.61,2179.33 2660.93,2179.65 2666.37,2179.65 v1(2668.67,2181.94) ; v1(2727.73,3356.72) 2728.81,3355.63 2728.81,3339.72 2741.53,3327 R25.1@2742.51,3327 ; C24.1@2750.17,3391 2750.81,3391.65 v1(2779.88,3391.65) ; C8.1@2887,1691 2889.19,1688.81 v1(2915.72,1688.81)
  Top Layer w20: C15.2@2962.2,2317 2963.1,2317.9 2963.1,2363.1 v2(2964,2364) ; U7.2@3036.21,2441 3058.62,2441 3059.71,2442.09 3071.95,2442.09 v2(3073.87,2444)
  Top Layer w25: R14.1@2098.02,587 v2(2136,587)
  other v1: 2485,2904 2525,2923 856,3227 855,3269
IMD_FAULT: C2.2 D2.1 J1.B10 R3.2 U2.3 | length 1760.6
  Top Layer w12: U2.3@2459,1521 R3.2@2527.49,1521 ; D2.1@2598,1581 2551.47,1581 2549.47,1583 C2.2@2528,1583 2528,1564.28 2527.49,1563.77 R3.2@2527.49,1521 ; J1.B10@2625.12,69.39 2703.18,147.45 ccw(c2694.67,155.91) 2706.67,155.91 2706.67,1323.1 2527.49,1502.28 R3.2@2527.49,1521
JTDI: H1.8 U13.50 | length 289.5
  Top Layer w10: U13.50@2612.2,3129.57 2655.02,3129.57 v1(2672.44,3147) ; v1(2801,3210) 2802,3211 H1.8@2868,3211
  GND Plane Bott w10: v1(2672.44,3147) 2738,3147 v1(2801,3210)
"NetAS TS_1": "AS TS.1" U8.7 U9.10 | length 590.2
  Top Layer w10: U9.10@1723.14,1809.41 1751.7,1809.41 1751.91,1809.2 1853.2,1809.2 v1(1891,1847)
  GND Plane Bott w10: v1(1891,1847) 1891,1809.2 2028.2,1672 2203,1672
NetC1_2: C1.2 D1.1 R1.2 U1.3 | length 184.1
  Top Layer w10: U1.3@2907.4,1112.99 2960.46,1112.99 R1.2@2963.01,1110.45 ; C1.2@2963.8,1174.43 2963.8,1130.94 2963.01,1130.15 R1.2@2963.01,1110.45 ; D1.1@3026,1110.06 3015.16,1110.06 3014.77,1110.45 R1.2@2963.01,1110.45
NetC3_2: C3.2 D3.1 R4.2 U3.3 | length 199.1
  Top Layer w10: U3.3@2466.4,1114.99 2511.76,1114.99 2512.3,1115.53 R4.2@2531.02,1115.53 ; C3.2@2531.02,1188.36 R4.2@2531.02,1115.53 ; D3.1@2592.46,1115.53 R4.2@2531.02,1115.53
NetC4_2: C4.2 D4.1 R6.2 U4.3 | length 198.2
  Top Layer w12: U4.3@2907,1515 R6.2@2980,1515 ; C4.2@2979.67,1579 2979.67,1535.03 2980,1534.7 R6.2@2980,1515 ; D4.1@3040,1509.94 2991.72,1509.94 R6.2@2980,1515
NetC13_1: C13.1 C14.2 F2.1 U6.2 U6.4 | length 610.5
  Top Layer w15: 3150,684.48 3151,685.48 C14.2@3151,704.2
  Top Layer w20: U6.4@2947.48,614 2958.68,625.2 C13.1@3150,625.2
  Top Layer w25: C13.1@3150,625.2 3150,684.48
  Top Layer w50: F2.1@2856,900 2856,705.48 U6.4@2947.48,614
NetC16_1: C16.1 F4.1 L1.2 U7.4 | length 301.6
  Top Layer w20: U7.4@2937.79,2478.4 2878.26,2478.4 2877.67,2479 L1.2@2848,2479 F4.1@2848,2586 2911.01,2586 2912.01,2585 C16.1@2952.2,2585
NetC26_1: C26.1 U14.4 | length 124.1
  Top Layer w10: U14.4@1469.92,2420.61 1484.06,2420.61 1487.92,2416.76 1487.92,2402.61 1532.66,2357.87 1535.04,2357.87 1548,2344.92 C26.1@1548,2344 ; U14.4@1485.53,2420.61 U14.4@1489.39,2416.76
NetC27_1: C27.1 U14.6 | length 154.3
  Top Layer w12: C27.1@1635,2342.61 1635,2404.55 1673.93,2443.47 1674.85,2443.47 1677.58,2446.2 U14.6@1710.08,2446.2
NetC30_1: C30.1 U13.47 | length 133.4
  Top Layer w8: U13.47@2519.68,3037.06 2519.68,2991.28 2580.96,2930 C30.1@2581.94,2930
NetC31_1: C31.1 U13.31 | length 133
  Top Layer w8: C31.1@2038.53,3129 2124.64,3129 2125.21,3129.57 U13.31@2171.26,3129.57
NetD6_1: D6.1 R11.1 | length 82.2
  Top Layer w15: D6.1@1887,908 1905.72,908 1906.28,908.57 R11.1@1969,908.57
NetD7_1: D7.1 R13.2 | length 77.2
  Top Layer w10: R13.2@3204.09,932.47 3204.09,910.8 3204.57,910.31 D7.1@3204.57,855.47
NetD8_1: D8.1 R12.1 | length 75.2
  Top Layer w10: R12.1@3063.43,2778 3063.43,2750.43 3064,2749.86 D8.1@3064,2703
NetD9_2: D9.2 Q1.1 R14.2 | length 134.2
  Top Layer w12: 2036.06,606.65 2037,605.72 R14.2@2037,587
  Top Layer w15: Q1.1@2035.57,720.63 2035.57,701.91 2036.06,701.42 D9.2@2036.06,650 2036.06,606.65
NetD10_1: D10.1 K1.5 Q2.3 | length 393
  Top Layer w10: D10.1@402.6,1320.76 402.6,1316.82 534.42,1185 K1.5@595,1185 596,1186 Q2.3@596,1326.63
NetF3_2: F3.2 Q1.3 | length 200.3
  Top Layer w25: Q1.3@2071,799.37 2194.22,799.37 2195,798.59 F3.2@2271,798.59
NetL1_1: L1.1 U7.5 | length 95.7
  Top Layer w20: L1.1@2848,2417.91 2877.67,2417.91 2891.97,2403.6 U7.5@2937.79,2403.6
"NetQ1 OUT_1": "Q1 OUT.1" U9.8 U11.2 | length 1010.6
  Top Layer w10: U11.2@1383,1775.71 1383,1757.98 1407.06,1733.91 1411.09,1733.91 v1(1413,1732) ; v1(1708,1733) 1723.14,1748.14 U9.8@1723.14,1758.23
  GND Plane Bott w10: v1(1413,1732) 1439,1706 1681,1706 v1(1708,1733) 1796.2,1644.8 1796.2,1597.95 1842.49,1551.66 2161.8,1551.66 2162.56,1550.91 2189.09,1550.91 2203,1537
NetR23_1: "SDC WDO.1" R23.1 R24.2 SW1.3 SW1.4 U14.2 | length 968.5
  Top Layer w10: SW1.3@1005.58,2598.05 SW1.4@1005.58,2853.95 ; 1313.5,2362.5 1345,2394 v1(1345,2471) 1373.28,2471.11 R24.2@1386,2471.49 ; R23.1@1411,2408.51 1411,2409.5 1398.28,2422.21 1397.3,2422.21 1386,2433.51 R24.2@1386,2471.49 ; U14.2@1469.92,2471.8 1437.43,2471.8 1437.12,2471.49 R24.2@1386,2471.49
  GND Plane Bott w10: SW1.3@1005.58,2598.05 1217.95,2598.05 v1(1345,2471)
NetR25_2: R25.2 U13.60 | length 69.5
  Top Layer w8: U13.60@2612.2,3326.43 2661.21,3326.43 2661.79,3327 R25.2@2681.49,3327
NetR28_2: R28.2 U15.3 | length 187.8
  Top Layer w12: R28.2@2090,2214 2150.83,2214 2221.83,2285 U15.3@2248.4,2285
NetR29_2: R29.2 U15.1 | length 116.6
  Top Layer w12: R29.2@2132,2385.51 2208.5,2385.51 2209.02,2385 U15.1@2248.4,2385
NetR32_2: R32.2 U15.5 | length 257.9
  Top Layer w10: U15.5@2248.4,2185 2275,2185 2352.98,2107.02 R32.2@2352.98,1986
NetR33_2: R33.2 U15.9 | length 142.1
  Top Layer w10: U15.9@2461,2135 2487.86,2135 cw(c2487.86,2125) 2494.91,2132.09 2561.28,2065.72 R33.2@2573.99,2061
"NetRST SW_1": "RST SW.1" U10.10 U10.11 U11.1 | length 864.1
  Top Layer w10: v1(1357,1706) 1445.41,1617.59 U10.10@1491.86,1617.59 U10.11@1491.86,1592 U10.11@1473.16,1592 ; v1@1357.41,1707.75 U11.1@1357.41,1775.71
  PWR Plane w10: 1316,2224.33 1261.66,2169.99 1261.66,1801.34 v1(1357,1706)
NetTP14_1: TP14.1 U9.5 U10.4 U10.9 | length 692.2
  Top Layer w10: U9.5@1490.86,1809.41 1489.38,1807.93 1464.93,1807.93 1437,1780 1437,1674 1466.34,1644.66 1490.38,1644.66 U10.9@1491.86,1643.18 1644.4,1643.18 1695.58,1592 U10.4@1724.14,1592 1752.7,1592 1865,1479.7 TP14.1@1865,1468
NetTP16_1: TP16.1 U9.9 U10.5 | length 404.5
  Top Layer w10: U9.9@1723.14,1783.82 1692.82,1783.82 1651,1742 1651,1662.17 1695.58,1617.59 U10.5@1724.14,1617.59 ; U10.5@1725.62,1616.11 1854.89,1616.11 TP16.1@1865,1606
NetTP20_1: TP20.1 U9.1 U11.4 | length 233.9
  Top Layer w10: U11.4@1408.59,1864.29 1419.36,1864.29 1465.36,1910.3 1489.38,1910.3 U9.1@1490.86,1911.77 1490.86,1979.86 TP20.1@1536,2025
NetU12_2: U12.2 U12.3 | length 25.6
  Top Layer w8: U12.3@1841.26,2840.2 U12.2@1841.26,2865.8
NetU13_5: U13.5 U22.3 | length 109.1
  Top Layer w8: U22.3@2440.49,3577.72 2440.49,3539.21 2458.85,3520.85 2458.85,3519.73 2459.9,3518.68 2459.9,3478.73 U13.5@2460.63,3478 ; U13.5@2459.9,3446.4 U13.5@2460.63,3447.13
PC10: J4.5 U13.51 | length 740
  Top Layer w10: v1(2542,3123) 2543.46,3123 2568.94,3148.48 2570.07,3148.48 2570.51,3148.91 2611.86,3148.91 U13.51@2612.2,3149.26
  GND Plane Bott w10: v1(2542,3123) 2770,3123 3021,3374 J4.5@3021,3450
PC11: J4.3 U13.52 | length 593.2
  Top Layer w10: v1(2556.89,3169.23) 2557.03,3169.09 2612.06,3169.09 U13.52@2612.2,3168.94
  GND Plane Bott w10: v1(2556.89,3169.23) 2632.57,3169.23 2634.34,3171 2704.48,3171 2971,3437.52 2971,3440.77 2971,3445.39 J4.3@2971,3450
PC12: J4.1 U13.53 | length 418.6
  Top Layer w10: U13.53@2612.2,3188.63 2659.07,3188.63 2665.44,3195 v1(2668.69,3195)
  GND Plane Bott w10: v1(2668.69,3195) 2668.69,3197.69 J4.1@2921,3450
PC13: J4.2 U13.2 | length 540.2
  Top Layer w10: v1(2491.99,3416.73) 2494.29,3419.03 2503.2,3419.03 2519.68,3435.52 U13.2@2519.68,3478
  PWR Plane w10: v1(2491.99,3416.73) 2529.75,3454.48 2785.48,3454.48 2828.09,3497.09 ; 2828.09,3500 J4.2@2921,3500
PC14: J4.4 U13.3 | length 542.9
  Top Layer w10: U13.3@2500,3478 2500.35,3478.35 2500.35,3518.92 2500.78,3519.35 2500.78,3521.26 2515.53,3536.01 2593.99,3536.01 v1(2595,3535)
  PWR Plane w10: v1(2595,3535) 2604.74,3544.74 2926.26,3544.74 J4.4@2971,3500
PC15: J4.6 U13.4 | length 722.6
  Top Layer w10: v1(2479.15,3531.66) 2479.97,3530.84 2479.97,3478.35 U13.4@2480.31,3478
  PWR Plane w10: v1(2479.15,3531.66) 2579.39,3631.91 2941.09,3631.91 3021,3552 J4.6@3021,3500
ROTARY_1: C36.2 J1.B7 R31.2 R33.1 | length 2468.7
  Top Layer w10: R31.2@2568,2125 C36.2@2636,2125 R33.1@2636,2061 2687.61,2061 3116.06,1632.55 3258,1490.61 3258,207.39 J1.B7@3120,69.39
ROTARY_2: C35.2 J1.B6 R30.2 R32.1 | length 2353.1
  Top Layer w10: C35.2@2349,1918 R30.2@2414,1918 R32.1@2414,1986 2690,1986 3240,1436 3240,439.39 J1.B6@3120,319.39
ROTARY_3: C33.2 J1.B11 R27.2 R29.1 | length 2588
  Top Layer w12: R27.2@2053.98,2392 R27.2@2053,2392 C33.2@2053,2324 2112.8,2324 2113.28,2324.49 R29.1@2132,2324.49 2132,2273 v1(2131,2272)
  GND Plane Bott w12: v1(2131,2272) 2131,2196 2322,2005 2322,1555.39 2518,1359.39 2518,304.54 2460.16,246.69 J1.B11@2460.16,69.39
ROTARY_4: C32.2 J1.B2 R26.2 R28.1 | length 2134.7
  Top Layer w12: R28.1@2028.98,2214 2028.98,2167.72 R26.2@2029,2148 C32.2@2101,2148 2101.5,2147.5 2133.09,2147.5 v1(2133.47,2147.88)
  GND Plane Bott w12: v1(2133.47,2147.88) 2291,1990.36 2291,869.86 2460.16,700.7 J1.B2@2460.16,319.39
SDC_IN: "SDC IN.1" J1.A8 K1.3 U21.10 | length 4858.3
  Top Layer w8: v1@1255,1508.75 1238,1525.75 1238,3238.86 cw(c1248,3238.86) 1240.9,3245.9 1360.03,3365.03 cw(c1367.12,3357.98) 1367.12,3367.98 U21.10@1477.83,3367.98
  Top Layer w10: v1(1255,1504) v1@1255,1508.75
  Top Layer w100: J1.A8@294.8,319.39 295,319.58 K1.3@295,485
  GND Plane Bott w10: K1.3@271.14,485 K1.3@295,485 123,657 123,1739 207,1823 936,1823 v1(1255,1504)
  PWR Plane w10: K1.3@264.09,487.91 ccw(c271.14,495) K1.3@271.14,485
SDC_OUT: "SDC OUT.1" J1.A9 K1.2 | length 1468.9
  Top Layer w100: K1.2@295,785 459.76,620.24 J1.A9@459.76,319.39
  GND Plane Bott w10: 208,1684 208,872 K1.2@295,785
SWCLK: H1.4 U13.49 | length 256.3
  Top Layer w8: U13.49@2612.2,3109.89 2732.64,3109.89 2733.75,3111 H1.4@2868,3111
SWDIO: H1.2 U13.46 | length 428
  Top Layer w10: U13.46@2500,3037.06 2500,3079.54 2511.85,3091.39 2568.53,3091.39 2568.94,3090.98 2782.02,3090.98 2812,3061 H1.2@2868,3061
SWO: H1.6 U13.55 | length 283.5
  Top Layer w10: U13.55@2612.2,3228 2745,3228 2812,3161 H1.6@2868,3161
TS_SWITCH: J1.A1 U21.14 | length 3904.7
  Top Layer w10: J1.A1@954.65,69.39 885.95,138.09 786.91,138.09 716,209 716,1238.91 1105.78,1628.69 1105.78,3011.89 ccw(c1061,3012) 1105.78,3012.27 1105,3185.86 ; v1(1074.89,3220.71) 1086.37,3214.75 1100.43,3200.69 1101.58,3197.24 1105,3185.9 ; v1(1386.56,3225.84) 1426.33,3265.61 U21.14@1477.83,3265.61
  GND Plane Bott w10: v1(1074.89,3220.71) 1078.13,3220.71 1083.27,3225.84 v1(1386.56,3225.84)
WDG_CTL: "WDG CTL.1" U13.35 U14.7 | length 1409.1
  Top Layer w8: U14.7@1710.08,2471.8 1779.8,2471.8 v1(1854,2546) 1861.72,2546.02 ccw(c1861.67,2554.02) 1867.33,2548.36 2281.15,2964.14 ccw(c2275.46,2969.77) 2283.46,2969.77 U13.35@2283.46,3037.06
  GND Plane Bott w8: v1(1854,2546) 1867,2559 1867,3101
pads on no net: D10.2 H1.7 H1.9 J1. K1.1 U9.6 U10.1 U10.2 U10.3 U13.6 U13.8 U13.9 U13.10 U13.11 U13.14 U13.17 U13.25 U13.26 U13.27 U13.30 U13.41 U13.43 U13.54 U13.56 U13.59 U13.61 U13.62 U15.10 U15.11 U15.12 U15.13 U16.5 U17.5 U18.5 U18.6 U18.10 U18.11 U18.12 U18.13 U18.14 U19.12 U20.12 U21.12

## Polygon pours and split planes (outlines as drawn)
+12V on PWR Plane "+12V" (solid, remove dead copper, pour order 38): 39.71,14 39.71,3495.85 410.15,3866.29 2877.25,3866.29 3247.69,3495.85 3247.69,14
+5V on PWR Plane "+5V" (solid, remove dead copper, pour order 30): 2968,826 3287.4,826 3287.4,2521 2968,2521
+3V3 on PWR Plane "+3V3" (solid, remove dead copper, pour order 29): 675,1467 1975,1467 1975,2056 1402,2056 1402,2318 1080.75,2318 1074.93,2714 1724,2714 1724,2551 2050,2551 2050,2806 2464,2806 2464,2767 3249.99,2767 3249.37,3494.17 2877.54,3866 1674,3866 1674,3697 1990,3697 1990,3192 1455,3192 1455,3188 675,3188
GND on GND Plane Top "GND_A" (solid, remove dead copper, pour order 16): 0,-95 0,3512.3 393.7,3906 2893.7,3906 3287.4,3512.3 3287.4,-95
GND on GND Plane Bott "GND_B" (solid, pour order 31): 0,-23 0,3512.3 393.7,3906 2893.7,3906 3287.4,3512.3 3287.4,-23
GND on Top Layer "GND Around Signal" (solid, remove dead copper, pour order 32): 0,3906 3287.4,3906 3287.4,-23 0,-23

## Silkscreen, mask and mechanical layers (free items; w line width, h text height)
Top Overlay:
  drawing of 129 lines, arcs and shapes, not listed
  text "MICRO RESET" at 2951,3734.95 h60 r270
  text "MICRO / CONTROLLER" at 2067.85,3719.99 h60
  text "LLC UP/DOWN" at 1791,3476.31 h60 r270
  text "ISP HEADER" at 2881.45,3311.93 h60
  text "CAN LAND" at 714.34,3242 h60
  text "Anh Tran" at -28.31,3130 h70
  text "Anhadh Virk" at 7.69,3079 h70
  text "Alignment's for nerd" at 1412,3036 h30 r270
  text "Ethan Ney" at -11.31,3028 h70
  text "Sanya Arora" at 5.69,2974 h70
  text "SUPERVISOR RESET" at 753,2576.93 h60 r90
  text "NON PROGRAMMABLE LOGIC" at 1588.37,2078.63 h60
  text "\"Shut up and eat your rice\"" at 846,1995 h20
  text "ROTR" at 2491,1958.98 h60 r270
  text "DFMM v4.1" at 408.01,1884.41 h150
  text "2025" at 389.67,1777 h100
  text "INPUT PROTECTION" at 2612.07,1368.34 h60
  text "We're so back besties" at 1799,1152 h60
  text "POWER IC" at 2066.5,999 h60
  text "12V" at 255,214.66 h60
  text "12V" at 2667,174.22 h80
  text "12V" at 2317.44,151.21 h80 r90
  text "GND" at 2482.55,140.32 h80 r90
  text "GND" at 2978.26,139 h80 r90
  text "GND" at 3137.55,135.32 h80 r90
  text "12V" at 832,116.66 h60
Bottom Overlay:
  drawing of 5128 lines, arcs and shapes, not listed
  text "James Larking" at 1425,673 h100
  text "ASSI TX" at 598,375.8 h50 r270
  text "SDC OUT" at 434,372 h50 r270
  text "ROTR 2" at 3094,368.5 h50 r270
  text "CAN1 L" at 100,359 h50 r270
  text "ROTR 4" at 2263,356 h50 r270
  text "ASMS" at 2590,353 h50 r270
  text "ANL 1" at 756,351 h50 r270
  text "+24V" at 2923,347 h50 r270
  text "ANL 2" at 927,346 h50 r270
  text "GND" at 2427,343 h50 r270
  text "BMS" at 2755,342 h50 r270
  text "SDC IN" at 189,282 h50 r270
  text "CAN2 L" at 433,125.5 h50 r270
  text "CAN2 H" at 280,124 h50 r270
  text "CAN1 H" at 114,122 h50 r270
  text "ROTR 1" at 3096,118 h50 r270
  text "TS SW" at 929,116 h50 r270
  text "ROTR 3" at 2262,113.5 h50 r270
  text "GND" at 2438,113 h50 r270
  text "AS SDC" at 766,112 h50 r270
  text "EBS_LED" at 553,106 h50 r270
  text "BSPD" at 2756,99 h50 r270
  text "IMD" at 2596,93 h50 r270
  text "+24V" at 2922,91 h50 r270